# Altium PCB PCB_Lora(long-range)-board_2026-11-07.pcbdoc (part 1 of 2)
Units mil, origin at the board's own origin, x right, y up, seen from the top; angles counter-clockwise.
Board outline 3860 x 3395 mil, 2 copper layers (Top Layer, Bottom Layer); 64 components, 85 nets, 224 pads, 399 vias.
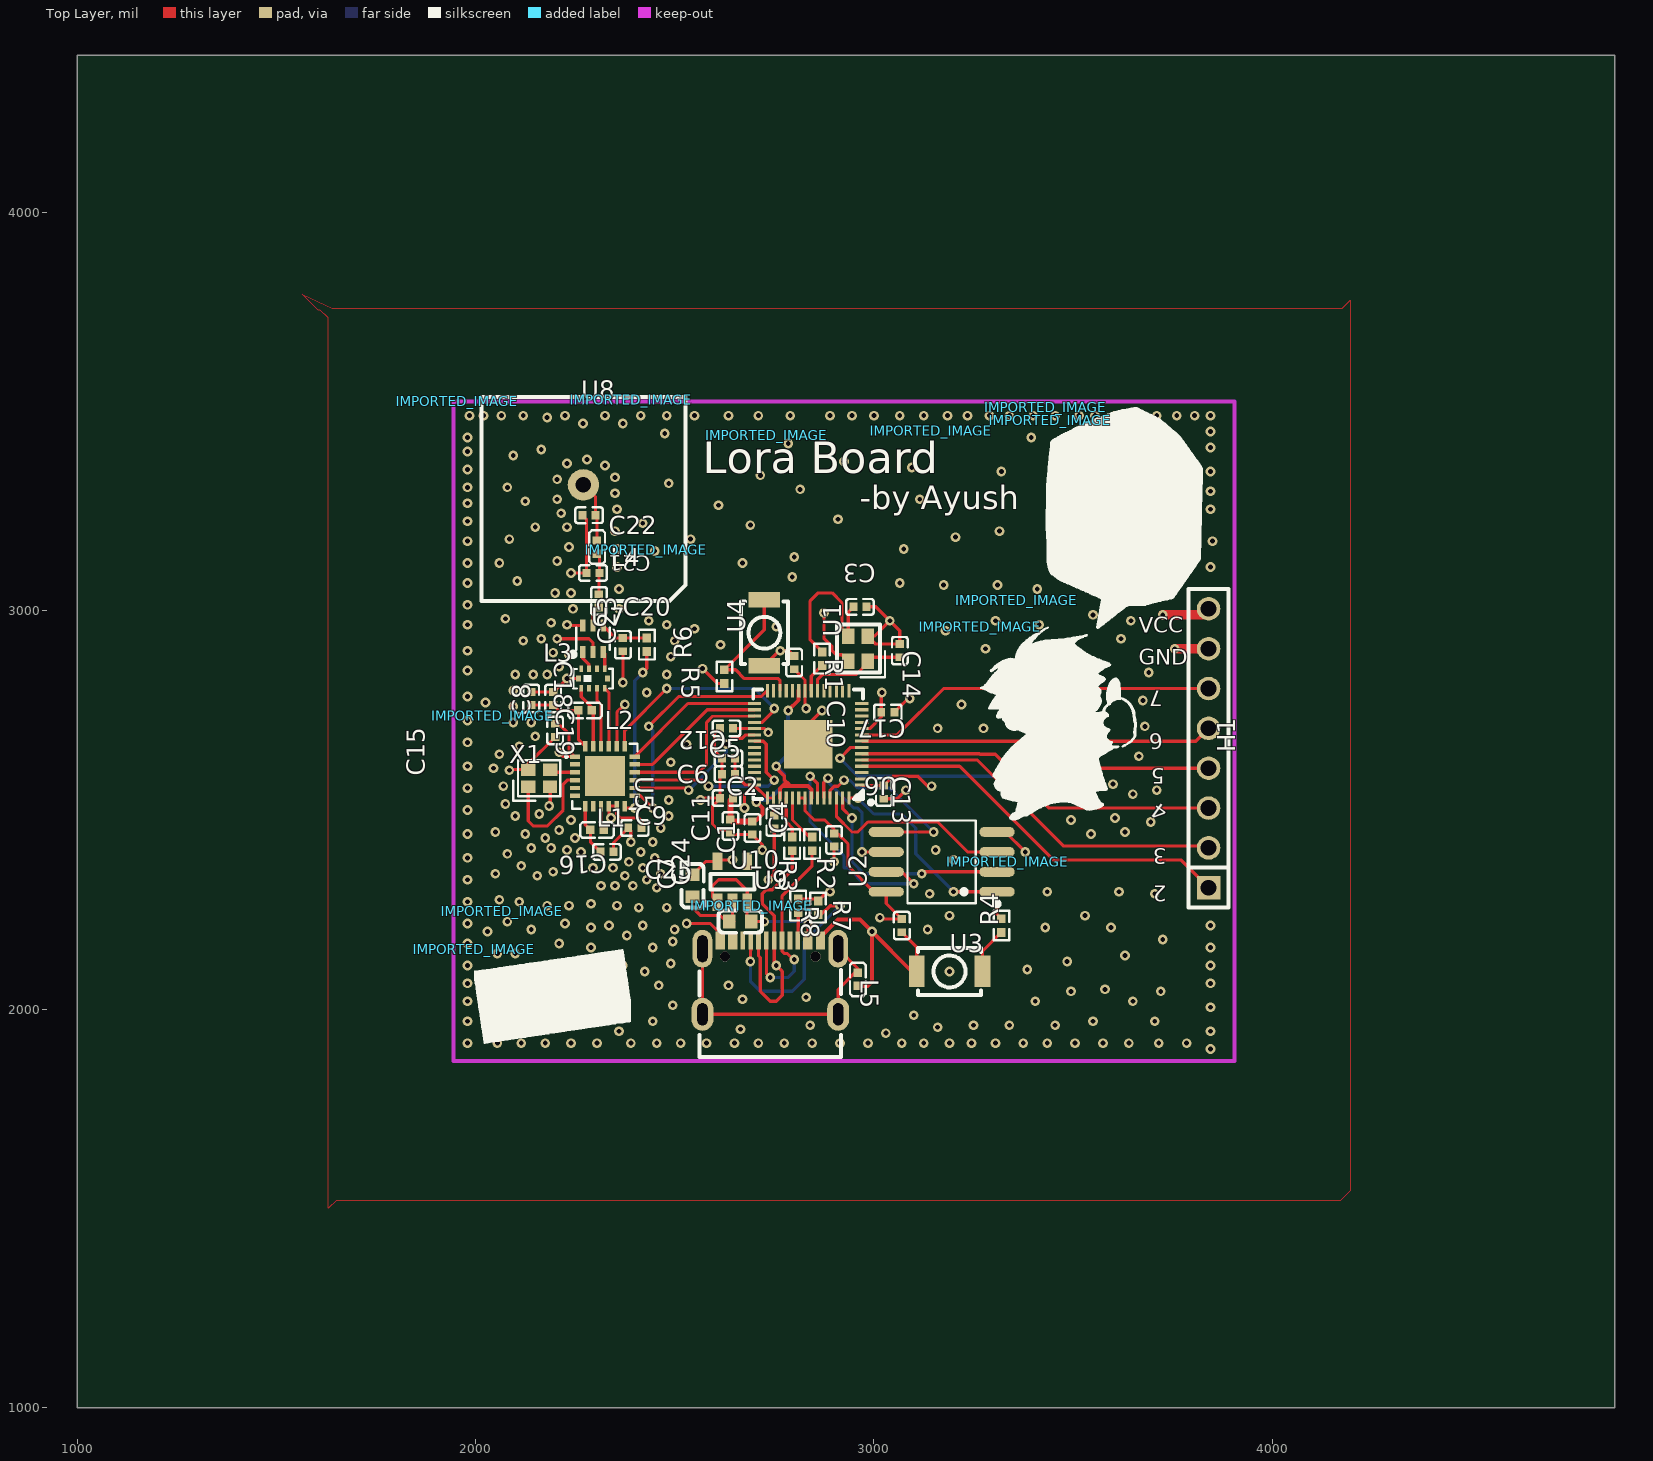
[diagram p0: Top Layer view]
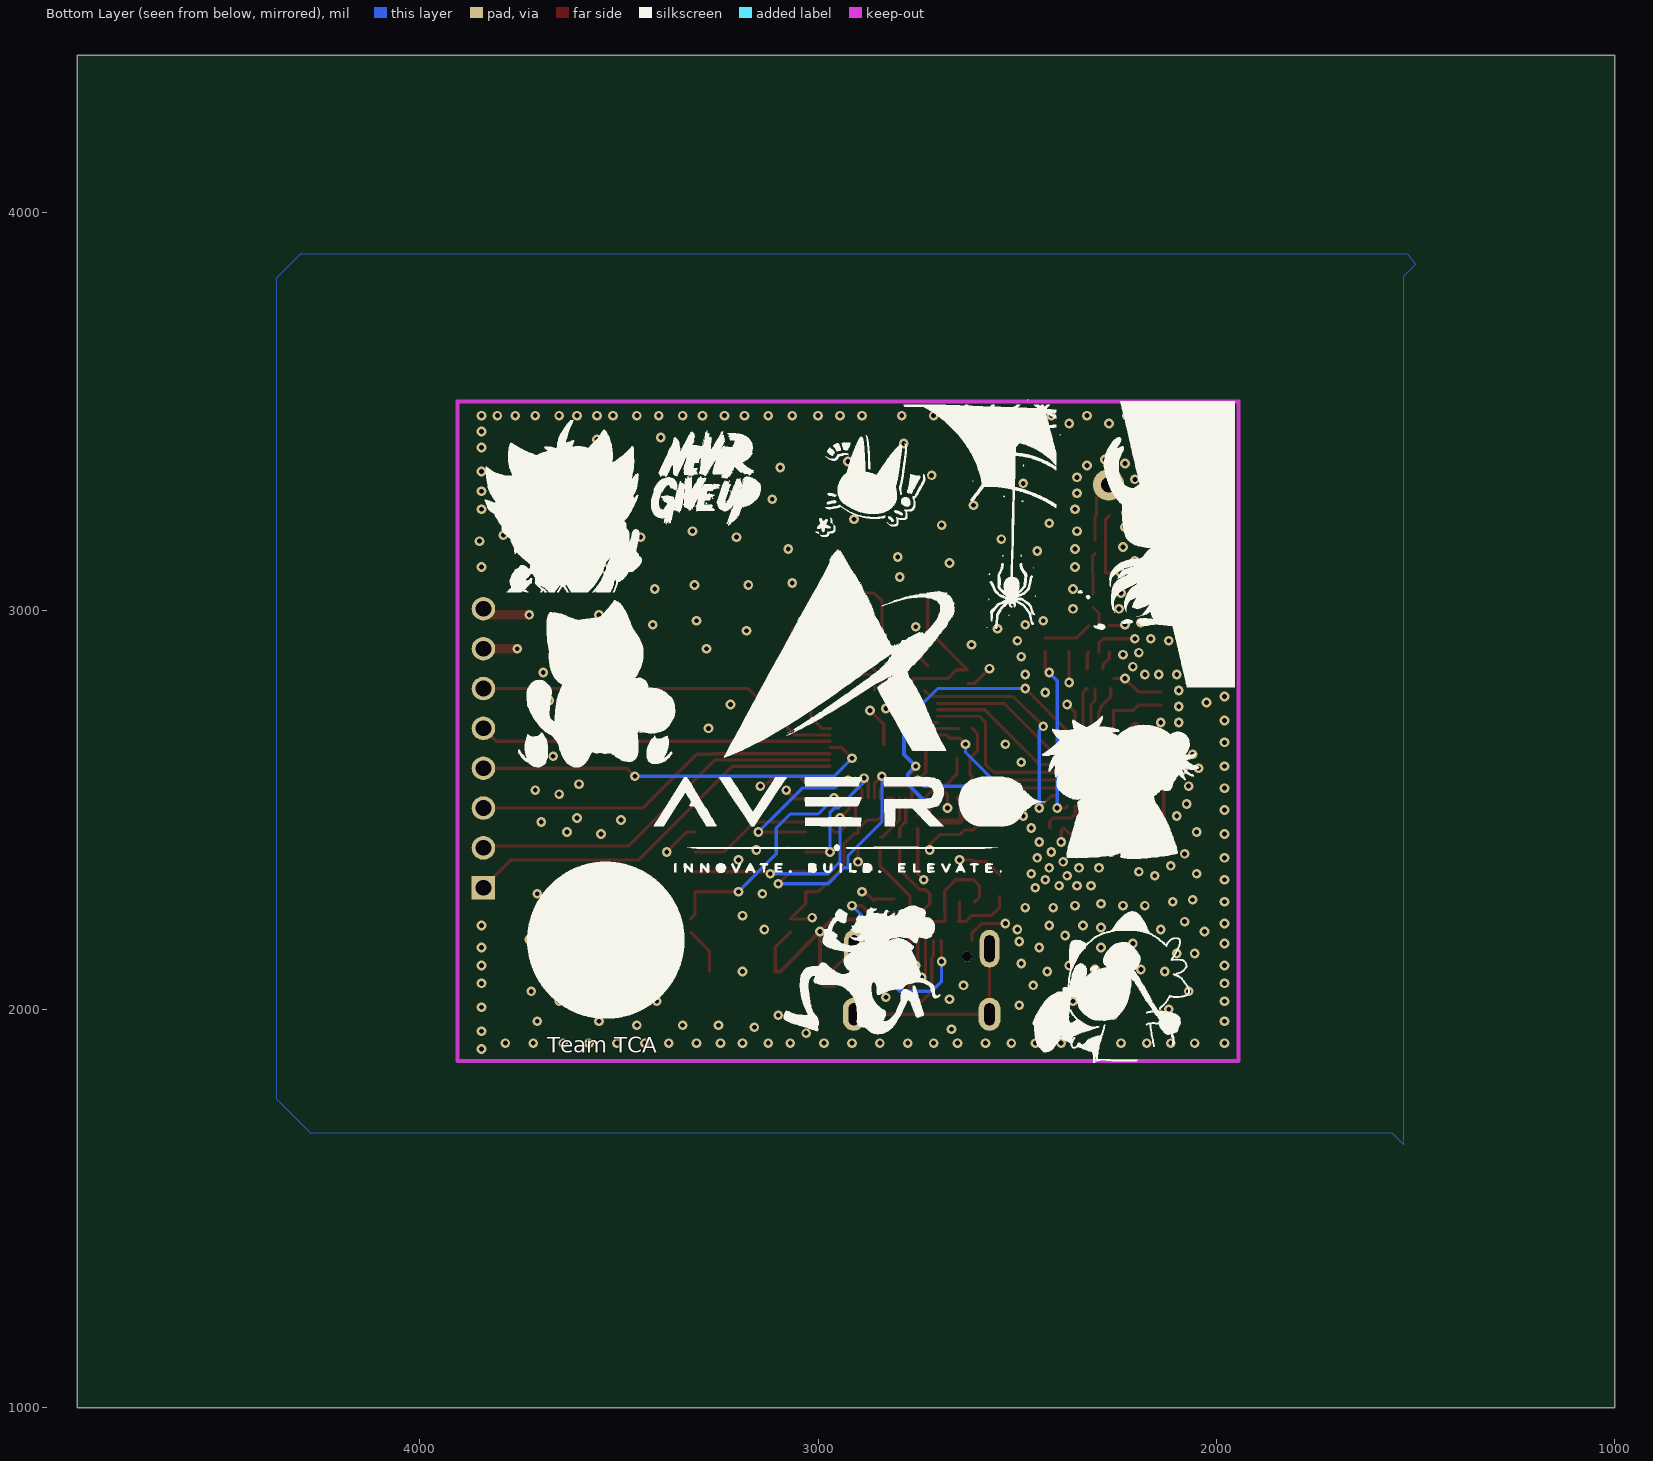
[diagram p1: Bottom Layer view, seen from below]

## Layer stack, top to bottom
Top Layer: signal copper (thickness not stored)
Dielectric: dielectric 12.6, FR-4, Dk 4.8
Bottom Layer: signal copper (thickness not stored)

## Board outline
4860,1000 1000,1000 1000,4395 4860,4395

## Components (designator, comment, footprint, x,y, rotation, side; value= is the part's Value field where it differs from the comment)
C1 "100nF" C0402 2640,2460 r90 top
C2 "100nF" C0402 2630,2530 r0 top
C3 "15pF" C0402 2965,3010 r180 top
C4 "100nF" C0402 2750,2470 r90 top
C5 "100nF" C0402 2635,2630 r0 top
C6 "100nF" C0402 2635,2590 r0 top
C7 "100nF" C0402 3070,2210 r90 top
C8 "100nF" C0402 2200,2700 r90 top
C9 "100nF" C0402 2400,2455 r0 top
C10 "100nF" C0402 2800,2870 r270 top
C11 "1uf" C0402 2695,2455 r90 top
C12 "1uF" C0402 2630,2705 r180 top
C13 "100nF" C0402 3025,2545 r270 top
C14 "15pF" C0402 3065,2900 r270 top
C15 "100nF" C0402 2900,2425 r90 top
C16 "470nf" C0402 2330,2395 r180 top
C17 "100nf" C0402 3035,2745 r180 top
C18 "47pF" C0402 2140,2780 r270 top
C19 "47pF" C0402 2195,2780 r270 top
C20 "39pF" C0402 2310,3025 r270 top
C21 "3.3pF" C0402 2295,3095 r180 top
C22 "3.3pF" C0402 2285,3240 r180 top
C23 "1nF" C0402 2370,2915 r90 top
C24 "10uF" C0603 2545,2310 r90 top
C25 "10uF" C0603 2665,2220 r0 top
H1 "Header-Male-2.54_1x8" HDR-TH_8P-P2.54-V-M 3840,2655 r90 top
IMPORTED_IMAGE "IMPORTED_IMAGE" IMPORTED_IMAGE 3442.58,3478.58 r0 top
IMPORTED_IMAGE "IMPORTED_IMAGE" IMPORTED_IMAGE 3143.78,3452.13 r0 top
IMPORTED_IMAGE "IMPORTED_IMAGE" IMPORTED_IMAGE 2428.12,3152.76 r0 top
IMPORTED_IMAGE "IMPORTED_IMAGE" IMPORTED_IMAGE 2731.18,3440.17 r0 top
IMPORTED_IMAGE "IMPORTED_IMAGE" IMPORTED_IMAGE 2391.1,3530.24 r0 top
IMPORTED_IMAGE "IMPORTED_IMAGE" IMPORTED_IMAGE 2043.85,2736.32 r0 top
IMPORTED_IMAGE "IMPORTED_IMAGE" IMPORTED_IMAGE 1954.47,3526.6 r0 top
IMPORTED_IMAGE "IMPORTED_IMAGE" IMPORTED_IMAGE 3358.59,3027.19 r0 top
IMPORTED_IMAGE "IMPORTED_IMAGE" IMPORTED_IMAGE 2067.35,2245.43 r0 top
IMPORTED_IMAGE "IMPORTED_IMAGE" IMPORTED_IMAGE 2693.22,2260.09 r0 top
IMPORTED_IMAGE "IMPORTED_IMAGE" IMPORTED_IMAGE 3336.01,2370.08 r0 top
IMPORTED_IMAGE "IMPORTED_IMAGE" IMPORTED_IMAGE 3266.7,2960.61 r0 top
IMPORTED_IMAGE "IMPORTED_IMAGE" IMPORTED_IMAGE 3431.95,3510.94 r0 top
IMPORTED_IMAGE "IMPORTED_IMAGE" IMPORTED_IMAGE 1996.42,2150.39 r0 top
L1 "15uH" L0402 2305,2450 r0 top
L2 "47nH" L0402 2275,2750 r0 top
L3 "0900FM15D0039001E" FILTER-SMD_10P-L2.0-W1.3-BL 2295,2830 r0 top
L4 "9.1nH" L0402 2305,3160 r90 top
L5 "1KΩ" L0402 2960,2075 r270 top
R1 "1k" R0402 2870,2880 r270 top
R2 "27.4" R0402 2845,2415 r270 top
R3 "27.4" R0402 2795,2415 r270 top
R4 "1k" R0402 3320,2210 r90 top
R5 "10k" R0402 2625,2835 r270 top
R6 "100" R0402 2430,2915 r90 top
R7 "5.1K" R0402 2860,2255 r270 top
R8 "5.1K" R0402 2810,2260 r270 top
U1 "XTAL12MHZ" CRYSTAL-SMD_4P-L2.5-W2.0-BL_XTAL12MHZ 2960,2905 r90 top
U2 "W25Q128JVSIQ" SOIC-8_L5.3-W5.3-P1.27-LS8.0-BL 3170,2370 r90 top
U3 "TS-1071AD-A5B3-D4" KEY-SMD_2P-L4.0-W3.0-P4.20 3190,2095 r0 top
U4 "TS-1071AD-A5B3-D4" KEY-SMD_2P-L4.0-W3.0-P4.20 2725,2945 r90 top
U5 "-" QFN-24_L4.0-W4.0-P0.50-BL-EP2.6 2325,2585 r270 top
U6 "RP2040" LQFN-56_L7.0-W7.0-P0.4-EP 2835,2665 r180 top
U7 "PE4259-63" SC-70-6_L2.2-W1.3-P0.65-LS2.1-BL 2295,2930 r0 top
U8 "GPS_PATCH_ANTENNA - APAE1575R1340ABDD6-T" "GPS_PATCH_ANTENNA - APAE1575R1340ABDD6-T" 2015,3025 r0 top
U9 "USB_C_RECEPTACLE_HRO_TYPE-C-31-M-12" USB-SMD_TYPE-C16PIN-1 2740,2080 r0 top
U10 "AP2112K-3.3TRG1" SOT-25-5_L2.9-W1.6-P0.95-LS2.8-BL 2645,2320 r0 top
X1 "32MHz" CRYSTAL-SMD_4P-L2.0-W1.6-BL 2160,2580 r0 top

## Footprints (in the part's own frame and the unit in brackets; to place one, negate y for a bottom-side part, rotate by r counter-clockwise, add the part's x,y. Pads: shape width x height; smd on the part's side, far side on the other; paste and mask are expansions set on the pad)
C0402 [mm]
  rect 0.5x0.54 smd paste+0 mask+0.051: 1(-0.42,0) 2(0.42,0)
  silkscreen extent -0.87,-0.5 0.87,0.5
C0603 [mm]
  rect 0.8x0.9 smd paste+0 mask+0.051: 1(-0.7,0) 2(0.7,0)
  silkscreen extent -1.39,-0.71 1.39,0.71
CRYSTAL-SMD_4P-L2.0-W1.6-BL [mm]
  rect 0.9x0.8 smd paste+0 mask+0.051: 1(-0.7,-0.55) 2(0.7,-0.55) 3(0.7,0.55) 4(-0.7,0.55)
  silkscreen extent -1.65,-1.45 1.35,1.15
CRYSTAL-SMD_4P-L2.5-W2.0-BL_XTAL12MHZ [mm]
  rect 1x0.8 smd paste+0 mask+0.051: 1(-0.8,-0.625) 2(0.8,-0.625) 3(0.8,0.625) 4(-0.8,0.625)
  silkscreen extent -1.82,-1.73 1.55,1.33
FILTER-SMD_10P-L2.0-W1.3-BL [mm]
  rect 0.25x0.4 smd paste+0 mask+0.051: 1(-0.75,-0.625) 2(-0.25,-0.625) 3(0.25,-0.625) 4(0.75,-0.625) 6(0.75,0.625) 7(0.25,0.625) 8(-0.25,0.625) 9(-0.75,0.625)
  rect 0.3x0.4 smd paste+0 mask+0.051: 5(0.925,0) 10(-0.925,0)
  silkscreen extent -1.25,-0.64 1.25,0.62
"GPS_PATCH_ANTENNA - APAE1575R1340ABDD6-T" [mm]
  round 2 hole 1 paste+0 mask+0.051: 1(6.5,7.4)
  silkscreen extent 0,0 13,13
HDR-TH_8P-P2.54-V-M [mm]
  rect 1.5x1.5 hole 1 paste+0 mask+0.051: 1(-8.89,0)
  round 1.5 hole 1 paste+0 mask+0.051: 2(-6.35,0) 3(-3.81,0) 4(-1.27,0) 5(1.27,0) 6(3.81,0) 7(6.35,0) 8(8.89,0)
  silkscreen extent -10.16,-1.27 10.16,1.27
IMPORTED_IMAGE [mil]
KEY-SMD_2P-L4.0-W3.0-P4.20 [mm]
  rect 1x2 smd paste+0 mask+0.05: 1(-2.1,0) 2(2.1,0)
  silkscreen extent -2,-1.5 2,1.5
L0402 [mm]
  rect 0.54x0.54 smd paste+0 mask+0.051: 1(-0.42,0) 2(0.42,0)
  silkscreen extent -1.07,-0.51 1.07,0.49
LQFN-56_L7.0-W7.0-P0.4-EP [mm]
  rect 0.85x0.2 smd paste+0 mask+0.05: 1(-3.425,2.6) 2(-3.425,2.2) 3(-3.425,1.8) 4(-3.425,1.4) 5(-3.425,1) 6(-3.425,0.6) 7(-3.425,0.2) 8(-3.425,-0.2) 9(-3.425,-0.6) 10(-3.425,-1) 11(-3.425,-1.4) 12(-3.425,-1.8) 13(-3.425,-2.2) 14(-3.425,-2.6) 29(3.425,-2.6) 30(3.425,-2.2) 31(3.425,-1.8) 32(3.425,-1.4) 33(3.425,-1) 34(3.425,-0.6) 35(3.425,-0.2) 36(3.425,0.2) 37(3.425,0.6) 38(3.425,1) 39(3.425,1.4) 40(3.425,1.8) 41(3.425,2.2) 42(3.425,2.6)
  rect 0.2x0.85 smd paste+0 mask+0.05: 15(-2.6,-3.425) 16(-2.2,-3.425) 17(-1.8,-3.425) 18(-1.4,-3.425) 19(-1,-3.425) 20(-0.6,-3.425) 21(-0.2,-3.425) 22(0.2,-3.425) 23(0.6,-3.425) 24(1,-3.425) 25(1.4,-3.425) 26(1.8,-3.425) 27(2.2,-3.425) 28(2.6,-3.425) 43(2.6,3.425) 44(2.2,3.425) 45(1.8,3.425) 46(1.4,3.425) 47(1,3.425) 48(0.6,3.425) 49(0.2,3.425) 50(-0.2,3.425) 51(-0.6,3.425) 52(-1,3.425) 53(-1.4,3.425) 54(-1.8,3.425) 55(-2.2,3.425) 56(-2.6,3.425)
  rect 3.1x3.1 smd paste+0 mask+0.05: 57(0,0)
  silkscreen extent -4.13,-3.5 3.5,3.83
QFN-24_L4.0-W4.0-P0.50-BL-EP2.6 [mm]
  rect 0.28x0.665 smd paste-100 mask+0.05: 1(-1.25,-1.907) 2(-0.75,-1.907) 3(-0.25,-1.907) 4(0.25,-1.907) 5(0.75,-1.907) 6(1.25,-1.907) 13(1.25,1.907) 14(0.75,1.907) 15(0.25,1.907) 16(-0.25,1.907) 17(-0.75,1.907) 18(-1.25,1.907)
  rect 0.665x0.28 smd paste-100 mask+0.05: 7(1.907,-1.25) 8(1.907,-0.75) 9(1.907,-0.25) 10(1.907,0.25) 11(1.907,0.75) 12(1.907,1.25) 19(-1.907,1.25) 20(-1.907,0.75) 21(-1.907,0.25) 22(-1.907,-0.25) 23(-1.907,-0.75) 24(-1.907,-1.25)
  rect 2.55x2.55 smd paste-100 mask+0.05: 25(0,0)
  silkscreen extent -2.08,-2.53 2.08,2.08
R0402 [mm]
  rect 0.566x0.54 smd paste-100 mask+0.051: 1(-0.433,0) 2(0.433,0)
  silkscreen extent -0.94,-0.5 0.94,0.5
SC-70-6_L2.2-W1.3-P0.65-LS2.1-BL [mm]
  rect 0.35x0.78 smd paste+0 mask+0.051: 1(-0.65,-0.84) 2(0,-0.84) 3(0.65,-0.84) 4(0.65,0.84) 5(0,0.84) 6(-0.65,0.84)
  silkscreen extent -1.43,-1.14 1.08,0.7
SOIC-8_L5.3-W5.3-P1.27-LS8.0-BL [mm]
  oval 0.63x2.25 smd paste+0 mask+0.051: 1(-1.905,-3.53) 2(-0.635,-3.53) 3(0.635,-3.53) 4(1.905,-3.53) 5(1.905,3.53) 6(0.635,3.53) 7(-0.635,3.53) 8(-1.905,3.53)
  silkscreen extent -2.82,-3.68 2.64,2.18
SOT-25-5_L2.9-W1.6-P0.95-LS2.8-BL [mil]
  rect 24.5x43.5 smd paste+0 mask+2: 1(-37.39,-51.18) 2(-0.03,-51.18) 3(37.39,-51.18) 4(37.39,51.18) 5(-37.39,51.18)
  silkscreen extent -75,-60 56,20
USB-SMD_TYPE-C16PIN-1 [mm]
  oval 1.25x2.4 hole 0.65 slot 1.7 at 90 deg paste+0 mask+0.05: 17(-4.325,1.828) 18(4.325,1.828)
  oval 1.4x2.1 hole 0.65 slot 1.4 at 90 deg paste+0 mask+0.05: 19(-4.325,-2.353) 20(4.325,-2.353)
  rect 0.6x1.15 smd paste-100 mask+0.051: A1B12(-3.2,2.353) A4B9(-2.4,2.353) B1A12(3.2,2.353) B4A9(2.4,2.353)
  rect 0.3x1.15 smd paste-100 mask+0.051: A5(-1.25,2.353) A6(-0.25,2.353) A7(0.25,2.353) A8(1.25,2.353) B5(1.75,2.353) B6(0.75,2.353) B7(-0.75,2.353) B8(-1.75,2.353)
  round 0.65 hole 0.65 unplated paste+0: ""(-2.89,1.328) ""(2.89,1.328)
  silkscreen extent -4.5,-5.07 4.5,0.47

## Via types
v1: diameter 24.41, hole 12.2, Top Layer to Bottom Layer, tented both sides, 399 vias

## Nets (pads, with @x,y where several pads share a name; then routed paths per layer and width w, separated by ;. In a path a pad name is that pad's centre, name@x,y a point inside that pad or via, vN(x,y) a via of type N, cw(c..) or ccw(c..) an arc to the next point about the centre after c; other vN are vias at no path point)
1V1: C1.2 C2.2 C11.2 U6.23 U6.45 U6.50 | length 736.6
  Top Layer w10: C11.2@2695,2471.53 2701.54,2471.54 2720,2490 2720,2505 v1(2705,2520) ; v1(2755,2610) 2755,2605 2775,2585 2775,2576.01 2786.01,2565 ; U6.45@2764.14,2530.16 2764.14,2554.14 2775,2565 ; 2767.1,2557.1 2770,2560 2835,2560 2842.9,2552.1 U6.50@2842.88,2530.16 ; v1(2785,2750) 2811.38,2776.38 U6.23@2811.38,2799.84
  Top Layer w15.75: C2.2@2646.53,2530 2640,2523.46 C1.2@2640,2476.53 2645,2471.54 C11.2@2695,2471.53
  Bottom Layer w10: v1(2705,2520) 2710,2525 2735,2525 2775,2565 2775,2590 v1(2755,2610) 2785,2640 v1(2785,2750)
C20_1: C20.1 C21.1 L4.1 | length 105.3
  Top Layer w8.07: L4.1@2305,3143.47 2311.54,3136.92 C21.1@2311.53,3095 2310,3093.46 C20.1@2310,3041.53
GND: C1.1 C2.1 C3.1 C4.1 C5.1 C6.1 C7.1 C8.1 C9.1 C10.1 C11.1 C12.2 C13.2 C14.1 C15.1 C16.1 C17.1 C18.1 C19.1 C21.2 C22.2 C23.1 H1.7 L3.10 L5.2 R7.1 R8.1 U1.2 U1.4 U2.4 U3.1 U4.1 U5.20 U6.57 U7.2 U9.A1B12 U9.B1A12 X1.2 X1.4 | length 3350.9
  Top Layer w8.07: v1(2085,2600) 2086.65,2601.65 2132.44,2601.65 2132.44,2615.9 C8.1@2200,2683.47 ; C18.1@2140,2796.53 C19.1@2195,2796.53 2196.54,2796.54 v1(2230,2830) L3.10@2258.59,2830 ; v1(2185,2510) 2187.56,2512.56 X1.2@2187.56,2558.35 ; v1(2205,2930) 2285,2930 2295,2920 U7.2@2295,2896.93 ; v1(2240,3095) C21.2@2278.47,3095 2278.46,3230 C22.2@2268.47,3240 ; C16.1@2346.53,2395 2346.54,2418.08 C9.1@2383.47,2455 2390,2448.46 v1(2390,2420) ; U5.20@2354.53,2660.1 2355,2660.57 2355,2745 v1(2375,2765) ; v1(2370,2820) C23.1@2370,2898.47 ; v1(2530,2215) 2590,2215 2614.02,2190.98 U9.A1B12@2614.02,2172.62 ; v1(2565,2525) 2570,2530 C2.1@2613.47,2530 ; C2.1@2610,2526.54 C2.1@2613.47,2530 ; C12.2@2613.47,2705 2600,2691.54 2600,2648.47 C5.1@2618.47,2630 C6.1@2618.47,2590 2613.46,2584.99 C2.1@2613.47,2530 ; v1(2720,2400) 2720,2413.46 C11.1@2695,2438.47 2645,2438.46 C1.1@2640,2443.47 2633.46,2450 2610,2450 2595,2465 2595,2510 2613.46,2528.46 C2.1@2613.47,2530 ; U4.1@2725,2862.32 2762.68,2900 v1(2765,2900) 2786.54,2900 C10.1@2800,2886.53 ; v1(2735,2325) 2750,2340 C4.1@2750,2453.47 ; R8.1@2810,2277.04 2855,2277.04 R7.1@2860,2272.04 2882.96,2295 v1(2890,2295) ; U6.57@2835,2665 2835,2715 v1(2870,2750) ; v1(2875,2995) 2875,2930 2895,2910 2895,2900 2905,2890 2918.9,2890 U1.4@2935.39,2873.5 ; v1(2900,2370) C15.1@2900,2408.47 ; C3.1@2981.53,3010 3005,3010 v1(3040,2975) ; C13.2@3025,2528.47 3058.46,2528.46 v1(3080,2550) ; C17.1@3051.53,2745 3061.53,2755 3086.53,2780 v1(3090,2780) ; C7.1@3070,2193.47 3107.32,2156.14 U3.1@3107.32,2095 ; U2.4@3308.98,2445 3330,2445 v1(3380,2395) ; v1(3040,2975) 3065,2950 C14.1@3065,2916.53 3004.57,2916.54 U1.2@2984.61,2936.5 3001.5,2936.5 v1(3040,2975)
  Top Layer w10: U9.B1A12@2865.99,2172.62 2865.98,2180.98 2910,2225 2965,2225 v1(2995,2195) ; L5.2@2960,2058.47 2983.46,2058.46 2995,2070 v1(2995,2195) ; U3.1@3107.32,2095 3095,2095 v1(2995,2195)
  Top Layer w23.62: v1(3755,2905) H1.7@3840,2905
  other v1: 3845,1900 1980,1915 2055,1915 2115,1915 2175,1915 2240,1915 2305,1915 2390,1915 2455,1915 2515,1915 2580,1915 2650,1915 2710,1915 2775,1915 2845,1915 2915,1915 2985,1915 3070,1915 3125,1915 3190,1915 3245,1915 3305,1915 3375,1915 3435,1915 3505,1915 3575,1915 3640,1915 3715,1915 3785,1915 3030,1940 2360,1945 3845,1945 2665,1950 3160,1955 2840,1960 3250,1960 3340,1960 3455,1960 1980,1970 2445,1970 3550,1970 3705,1970 2260,1985 3100,1985 2120,2000 3845,2005 2495,2010 1980,2020 2360,2020 3405,2020 3650,2020 2670,2025 2830,2030 2070,2045 2255,2045 3495,2045 3720,2045 3580,2050 2335,2055 2460,2060 2635,2060 1980,2065 3845,2065 2130,2095 2425,2095 3190,2095 2190,2100 2305,2100 3385,2100 2260,2105 1980,2110 2370,2110 3845,2110 2490,2115 3485,2120 3630,2135 2055,2140 2100,2140 2290,2155 2445,2155 3845,2155 1980,2165 2210,2165 2495,2170 3725,2175 2380,2185 2030,2195 2140,2200 2500,2200 3135,2200 2290,2205 3430,2205 3595,2205 2335,2210 2420,2210 3845,2210 1980,2215 2225,2215 2080,2220 3190,2235 3530,2235 2410,2255 2480,2255 2180,2260 2235,2260 2355,2260 2290,2265 1980,2270 2110,2270 2060,2275 3140,2290 3705,2290 3435,2295 3615,2295 2455,2305 2315,2310 2350,2310 2395,2310 1980,2325 2430,2325 2155,2335 2375,2335 2050,2340 2465,2340 2195,2345 2295,2355 2345,2355 2420,2355 2115,2360 2385,2370 3200,2375 1980,2380 2450,2380 2080,2390 2265,2395 2415,2395 2230,2400 3155,2400 2140,2405 2190,2405 2445,2420 2175,2430 2250,2430 1980,2440 2125,2440 3545,2440 2050,2445 3630,2445 2210,2450 2465,2455 3695,2470 2240,2475 3495,2475 3605,2480 2100,2485 2485,2485 2160,2490 1980,2500 2075,2515 2485,2525 3650,2540 3710,2550 1980,2555 2070,2560 3600,2565 2045,2605 1980,2610 2490,2620 3665,2635 2060,2640 2110,2660 2530,2665 1980,2670 2150,2685 3160,2705 3275,2705 3445,2705 3680,2710 2095,2720 2140,2720 1980,2725 2095,2760 3220,2765 2025,2770 3675,2775 1980,2785 2430,2795 2095,2800 2100,2840 2145,2840 2180,2840 2480,2840 3690,2845 1980,2850 2210,2860 3560,2865 3455,2875 2490,2885 2235,2890 2195,2895 1980,2900 3280,2905 2615,2915 2120,2925 2500,2925 2165,2930 3620,2930 3180,2950 2550,2955 2755,2960 1980,2965 2480,2965 3415,2965 2190,2970 2435,2975 3305,2975 3645,2975 2075,2980 3550,2990 2245,3005 2360,3005 1980,3015 2200,3045 2240,3045 2360,3055 3410,3055 3175,3065 3310,3065 1980,3070 3065,3070 2105,3075 3695,3080 2795,3085 3535,3105 2355,3110 3845,3110 1980,3120 2060,3120 2670,3120 2205,3125 2800,3135 2450,3150 2355,3155 3075,3155 2235,3160 1980,3175 3850,3175 2085,3180 2540,3180 3205,3185 3445,3185 3790,3190 2350,3200 3315,3200 2150,3210 2230,3210 2690,3215 2420,3220 1980,3225 2910,3230 2215,3245 3620,3250 2355,3255 3845,3255 2610,3265 1980,3270 2125,3275 2205,3280 3115,3280 2350,3295 3845,3300 2815,3305 1980,3310 2080,3310 3510,3315 2485,3320 2205,3330 2350,3335 2715,3340 3320,3350 3845,3350 1980,3355 3690,3355 3095,3360 2325,3365 2230,3370 2925,3375 2280,3380 2095,3390 1980,3400 2165,3405 3845,3410 2785,3420 3555,3430 1980,3435 3395,3435 2475,3445 3845,3450 2270,3470 2370,3470 2180,3485 1985,3490 2020,3490 2065,3490 2120,3490 2225,3490 2325,3490 2415,3490 2480,3490 2550,3490 2635,3490 2710,3490 2790,3490 2890,3490 2945,3490 3000,3490 3065,3490 3125,3490 3185,3490 3235,3490 3290,3490 3340,3490 3400,3490 3455,3490 3515,3490 3555,3490 3605,3490 3650,3490 3710,3490 3760,3490 3805,3490 3845,3490
GPIO2: H1.1 U6.4 | length 996.4
  Top Layer w8.07: U6.4@2969.84,2609.89 3215.11,2609.89 3450,2375 3770,2375 H1.1@3840,2305
GPIO3: H1.2 U6.5 | length 961.5
  Top Layer w8.07: U6.5@2969.84,2625.63 3259.37,2625.63 3475,2410 3835,2410 H1.2@3840,2405
GPIO4: H1.3 U6.6 | length 926.7
  Top Layer w8.07: U6.6@2969.84,2641.38 3265,2641.38 3266.38,2640 3305,2640 3440,2505 H1.3@3840,2505
GPIO5: H1.4 U6.7 | length 1018
  Top Layer w8.07: v1(2915,2630) 2942.13,2657.13 U6.7@2969.84,2657.13 ; v1(3460,2585) 3480,2605 H1.4@3840,2605
  Bottom Layer w8.07: v1(2915,2630) 2960,2585 v1(3460,2585)
GPIO6: H1.5 U6.8 | length 898.5
  Top Layer w8.07: U6.8@2969.84,2672.88 3807.88,2672.88 H1.5@3840,2705 H1.5@3840,2720
GPIO7: H1.6 U6.9 | length 918.4
  Top Layer w8.07: U6.9@2969.84,2688.62 3058.63,2688.63 3175,2805 H1.6@3840,2805
L3_2: L3.2
L3_5: L3.5
L3_6: L3.6 U7.3 | length 44
  Top Layer w8.07: U7.3@2320.59,2896.93 2324.53,2892.99 L3.6@2324.53,2854.61
L3_7: L3.7
L3_8: L3.8 U7.1 | length 48.8
  Top Layer w8.07: U7.1@2269.41,2896.93 2269.41,2880.59 2285.16,2864.84 L3.8@2285.16,2854.61
L3_9: L3.9
L4_2: C22.1 L4.2 U8.1 | length 153.9
  Top Layer w8.07: U8.1@2270.91,3316.34 2301.54,3285.71 C22.1@2301.53,3240 2305,3236.54 L4.2@2305,3176.53
QPI_SS: R4.2 U2.1 U6.56 | length 623.6
  Top Layer w8.07: U6.56@2937.36,2530.16 2959.84,2530.16 v1(2960,2530) ; v1(3200,2295) U2.1@3308.98,2295 ; U2.1@3265,2295 U2.1@3308.98,2295 ; R4.2@3320,2227.04 3308.98,2238.06 U2.1@3308.98,2295
  Bottom Layer w8.07: v1(2960,2530) 3000,2490 3070,2490 3105,2455 3105,2390 v1(3200,2295)
QSPI_SCLK: U2.6 U6.52 | length 341.3
  Top Layer w8.07: U6.52@2874.37,2530.16 2874.37,2569.37 v1(2885,2580) ; v1(2970,2395) U2.6@3031.02,2395
  Bottom Layer w8.07: v1(2885,2580) 2885,2570 2950,2505 2960,2505 2970,2495 v1(2970,2395)
QSPI_SD0: U2.5 U6.53 | length 463
  Top Layer w8.07: U6.53@2890.12,2530.16 2890.12,2550.12 2900,2560 2910,2560 v1(2925,2575) ; U2.5@3031.02,2445 v1(3150,2445)
  Bottom Layer w8.07: v1(2925,2575) 2940,2575 2960,2555 3040,2555 3095,2500 v1(3150,2445)
QSPI_SD1: U2.2 U6.55 | length 548.3
  Top Layer w8.07: U6.55@2921.62,2530.16 2921.62,2503.38 v1(2945,2480) ; v1(3120,2340) 3125,2345 U2.2@3308.98,2345
  Bottom Layer w8.07: v1(2945,2480) 2945,2370 2975,2340 v1(3120,2340)
QSPI_SD2: U2.3 U6.54 | length 506.8
  Top Layer w8.07: U6.54@2905.87,2530.16 2905.9,2500.9 2905.9,2484.1 2945,2445 2960,2445 2985,2470 3160,2470 3235,2395 U2.3@3308.98,2395
QSPI_SD3: U2.7 U6.51 | length 600.7
  Top Layer w8.07: v1(2840,2585) 2858.62,2566.38 U6.51@2858.62,2530.16 ; U2.7@3031.02,2345 3070,2345 v1(3100,2315)
  Bottom Layer w8.07: v1(2840,2585) 2840,2470 2920,2390 2925,2385 2925,2355 2935,2355 2940,2350 2975,2315 v1(3100,2315)
RUN: R5.1 U4.2 U6.26 | length 393
  Top Layer w8.07: R5.1@2625,2852.04 2653,2852 2675,2830 2760,2830 2764.14,2825.86 U6.26@2764.14,2799.84 ; R5.1@2625,2852.04 2725,2952.05 U4.2@2725,3027.68
S$9588: 
SHIELD: L5.1 U9.17 U9.18 U9.19 U9.20 | length 715.6
  Top Layer w8.07: U9.17@2569.72,2151.95 U9.19@2569.72,1987.38 U9.20@2910.28,1987.38 ; U9.20@2910.28,1987.38 2910.3,2049.7 2951.5,2091.5 L5.1@2960,2091.53 ; U9.18@2910.28,2151.95 2960,2102.23 L5.1@2960,2091.53
SPI_CLK: U5.18 U6.29 | length 355.2
  Top Layer w8.07: U5.18@2400.1,2634.21 2533.26,2767.37 U6.29@2700.17,2767.36
SPI_MISO: U5.16 U6.31 | length 419.7
  Top Layer w8.07: U5.16@2400.1,2594.84 2559.8,2594.8 2580,2615 2580,2720 2595,2735 U6.31@2700.17,2735.87
SPI_MOSI: U5.17 U6.30 | length 356.8
  Top Layer w8.07: U5.17@2400.1,2614.53 2444.53,2614.53 2581.62,2751.62 U6.30@2700.17,2751.62
SX_BUSY: U5.14 U6.34 | length 371.5
  Top Layer w8.07: U5.14@2400.1,2555.47 2529.53,2555.47 v1(2535,2550) ; v1(2630,2665) 2645,2680 2670,2680 2678.63,2688.63 U6.34@2700.17,2688.62
  Bottom Layer w8.07: v1(2535,2550) 2630,2645 v1(2630,2665)
SX_DI01: U5.13 U6.28 | length 601.7
  Top Layer w8.07: U5.13@2400.1,2535.79 2414.21,2535.79 v1(2445,2505) ; v1(2435,2710) 2510,2785 2717.79,2785 U6.28@2732.64,2799.84
  Bottom Layer w8.07: v1(2435,2710) 2445,2700 v1(2445,2505)
SX_DI02: R6.1 U5.12 | length 433.2
  Top Layer w8.07: U5.12@2374.21,2509.9 2379.11,2505 v1(2400,2505) ; v1(2420,2845) 2430,2855 R6.1@2430,2897.96
  Bottom Layer w8.07: v1(2400,2505) 2400,2825 v1(2420,2845)
SX_DI03: U5.6
SX_NRESET: U5.15 U6.35 | length 498.8
  Top Layer w8.07: U5.15@2400.1,2575.16 2569.84,2575.16 v1(2585,2560) ; U6.35@2700.17,2672.88 2722.12,2672.88 2730,2665 2730,2635 2730,2595 v1(2750,2575) v1@2745,2575
  Bottom Layer w8.07: v1(2585,2560) 2735,2560 v1(2750,2575)
SX_NSS: U5.19 U6.32 | length 546.6
  Top Layer w8.07: U5.19@2374.21,2660.1 2374.21,2699.21 v1(2480,2805) ; U6.32@2700.17,2720.12 2720.1,2720.1 2750,2750 v1(2750,2755)
  Bottom Layer w8.07: v1(2480,2805) 2700,2805 v1(2750,2755)
SX_RFI_N: L3.3 U5.22 | length 149.6
  Top Layer w8.07: L3.3@2304.84,2805.39 2304.84,2775.16 2315.16,2764.84 U5.22@2315.16,2660.1
SX_RFI_P: L3.4 U5.21 | length 149.6
  Top Layer w8.07: L3.4@2324.53,2805.39 2334.84,2795.08 U5.21@2334.84,2660.1
SX_RFO: L2.2 L3.1 U5.23 | length 157.7
  Top Layer w8.07: L3.1@2265.47,2805.39 2265.47,2784.53 2291.54,2758.46 L2.2@2291.53,2750 2295.47,2746.07 U5.23@2295.47,2660.1
SX_VR_PA: C18.2 C19.2 L2.1 U5.24 | length 221.1
  Top Layer w8.07: C18.2@2140,2763.47 C19.2@2195,2763.47 2208.46,2750 L2.1@2258.47,2750 2258.46,2677.43 U5.24@2275.79,2660.1
SX_XTA: U5.3 X1.3 | length 65.2
  Top Layer w8.07: X1.3@2187.56,2601.65 2194.37,2594.84 U5.3@2249.9,2594.84
SX_XTB: U5.4 X1.1 | length 294.2
  Top Layer w8.07: X1.1@2132.44,2558.34 2132.4,2472.6 2145,2460 2180,2460 2220,2500 2220,2565 2230.16,2575.16 U5.4@2249.9,2575.16
U1_3: C3.2 R1.1 U1.3 | length 407.8
  Top Layer w8.07: R1.1@2870,2897.04 2840,2927.04 2840,3025 2860,3045 2890,3045 2895,3045 2920,3020 2920,2951.89 U1.3@2935.39,2936.5 2935.39,2996.93 C3.2@2948.47,3010
U3_2: R4.1 U3.2 | length 117.6
  Top Layer w8.07: U3.2@3272.68,2095 3272.68,2145.64 R4.1@3320,2192.96
U5_2: U5.2
U5_5: U5.5
U5_7: C16.2 L1.1 U5.7 | length 130.5
  Top Layer w8.07: U5.7@2275.79,2509.9 2275.79,2462.67 L1.1@2288.47,2450 2288.46,2420 C16.2@2313.47,2395
U5_8: U5.8
U5_9: L1.2 U5.9 | length 62.5
  Top Layer w8.07: U5.9@2315.16,2509.9 2315.16,2456.38 L1.2@2321.53,2450
U5_25: U5.25
U6_2: U6.2
U6_3: U6.3
U6_11: U6.11
U6_12: U6.12
U6_13: U6.13
U6_14: U6.14
U6_15: U6.15
U6_16: U6.16
U6_17: U6.17
U6_18: U6.18
U6_19: U6.19
U6_24: U6.24
U6_25: U6.25
U6_27: U6.27
U6_36: U6.36
U6_37: U6.37
U6_38: U6.38
U6_39: U6.39
U6_40: U6.40
U6_41: U6.41
U6_46: R3.1 U6.46 | length 104.4
  Top Layer w8.07: U6.46@2779.88,2530.16 2779.88,2470.12 2795,2455 R3.1@2795,2432.04
U6_47: R2.1 U6.47 | length 122.3
  Top Layer w8.07: U6.47@2795.63,2530.16 2795.63,2475 2838.59,2432.04 R2.1@2845,2432.04
U7_4: C23.2 R6.2 U7.4 | length 122.7
  Top Layer w8.07: U7.4@2320.59,2963.07 2352.12,2931.54 C23.2@2370,2931.53 2370.5,2932.04 2375.52,2932.04 R6.2@2430,2932.04
U7_5: C20.2 U7.5 | length 51.6
  Top Layer w8.07: U7.5@2295,2963.07 2295,2993.46 C20.2@2310,3008.47
U9_A4B9: U9.A4B9
U9_A5: R7.2 U9.A5 | length 546.8
  Top Layer w8.07: v1(2690,2120) U9.A5@2690.79,2172.62 ; R7.2@2860,2237.96 2868,2238 2890,2260 v1(2915,2260)
  Bottom Layer w8.07: v1(2690,2120) 2690,2070 2715,2045 2795,2045 2825,2075 2825,2170 v1(2915,2260)
U9_A8: U9.A8
U9_B5: R8.2 U9.B5 | length 70.8
  Top Layer w8.07: U9.B5@2808.9,2172.62 2810,2173.72 R8.2@2810,2242.96
U9_B8: U9.B8
U10_2: C24.1 C25.1 U10.2 | length 199.4
  Top Layer w8.07: C24.1@2545,2282.45 2545,2255 2560,2240 ; 2557.36,2242.64 2565,2235 2615,2235 2630,2220 2648.46,2220 2644.97,2223.49 U10.2@2644.97,2268.82
U10_4: U10.4
USB_DM: R3.2 U9.A7 U9.B7 | length 624.6
  Top Layer w8.07: U9.B7@2710.47,2172.62 2710.47,2134.53 2715,2130 2715,2045 2740,2020 2755,2020 2770,2035 2770,2095 v1(2755,2110) 2749.84,2115.16 U9.A7@2749.84,2172.62 2749.84,2235.16 2720,2265 2720,2290 2730,2300 2745,2300 2795,2350 R3.2@2795,2397.96
USB_DP: R2.2 U9.A6 U9.B6 | length 516.3
  Top Layer w8.07: U9.A6@2730.16,2172.62 2730.16,2089.84 v1(2740,2080) ; U9.B6@2769.53,2172.62 U9.B6@2770,2173.1 ; v1(2800,2125) 2797.36,2125 2782.36,2140 2775,2140 2769.53,2145.47 U9.B6@2769.53,2172.62 2769.53,2284.53 2845,2360 R2.2@2845,2397.96
  Bottom Layer w8.07: v1(2740,2080) 2785,2080 2800,2095 v1(2800,2125)
VBUS: C25.2 U9.B4A9 U10.1 U10.3 | length 427.1
  Top Layer w8.07: U10.1@2607.61,2268.82 2595,2281.43 2595,2310 2610,2325 2655,2325 2682.39,2297.61 U10.3@2682.39,2268.82 C25.2@2681.5,2220 ; C25.2@2681.54,2220 v1(2725,2220) ; U9.B4A9@2834.49,2172.62 2835,2173.13 v1(2835,2215)
  Bottom Layer w8.07: v1(2725,2220) 2830,2220 v1(2835,2215)
VCC: C4.2 C5.2 C6.2 C7.2 C8.2 C9.2 C10.2 C12.1 C13.1 C15.2 C17.2 C24.2 H1.8 R5.2 U2.8 U5.1 U5.10 U5.11 U6.1 U6.10 U6.22 U6.33 U6.42 U6.43 U6.44 U6.48 U6.49 U7.6 U10.5 | length 1974.1
  Top Layer w8.07: C8.2@2200,2716.53 2208.46,2716.54 2235,2690 2235,2649.11 U5.1@2249.9,2634.21 2220.79,2634.21 v1(2210,2645) ; v1(2230,2965) 2231.93,2963.07 U7.6@2269.41,2963.07 ; v1(2340,2480) 2334.84,2485.16 U5.10@2334.84,2509.9 U5.11@2354.53,2509.9 ; U5.11@2354.53,2509.9 2354.5,2490.5 2365,2480 2410,2480 2418.7,2471.3 2418.7,2457.16 C9.2@2416.53,2455 ; C24.2@2545,2337.55 2578.62,2371.18 U10.5@2607.61,2371.18 2611.43,2375 v1(2645,2375) ; v1(2570,2855) 2607.05,2817.95 R5.2@2625,2817.96 ; C12.1@2646.53,2705 U6.33@2700.17,2704.37 ; C5.2@2651.53,2630 C6.2@2651.53,2590 2678.9,2562.64 U6.42@2700.17,2562.64 ; v1(2675,2505) 2675,2537.48 U6.42@2700.17,2562.64 ; U6.33@2700.17,2704.37 2725.63,2704.37 v1(2735,2695) ; C4.2@2750,2486.53 2748.39,2488.15 U6.44@2748.39,2530.16 U6.43@2732.64,2530.16 U6.42@2700.17,2562.64 ; C10.2@2800,2853.47 2827.13,2826.33 U6.22@2827.13,2799.84 2827.13,2757.87 v1(2830,2755) ; U6.48@2811.38,2530.16 U6.49@2827.13,2530.16 ; U6.49@2825,2528.03 U6.49@2827.13,2530.16 ; U6.10@2969.84,2704.37 2989.4,2704.4 3018.5,2733.5 C17.2@3018.47,2745 ; U6.1@2969.84,2562.64 2970.95,2561.53 C13.1@3025,2561.53 3048.47,2585 3110,2585 3135,2560 v1(3145,2560) ; v1(3015,2230) 3018.46,2226.54 C7.2@3070,2226.53 3031.02,2265.52 U2.8@3031.02,2295 3000,2295 2935,2360 2935,2415 2908.46,2441.54 C15.2@2900,2441.53 2900,2451.54 2876.54,2475 2850,2475 2827.13,2497.87 U6.49@2827.13,2530.16 ; C17.2@3018.47,2745 3018.46,2793.46 v1(3020,2795)
  Top Layer w23.62: v1(3725,2990) 3825,2990 H1.8@3840,3005
XIN: C14.2 U1.1 U6.20 | length 260.1
  Top Layer w8.07: U6.20@2858.62,2799.84 2858.62,2828.62 2870,2840 2955,2840 2984.61,2869.61 U1.1@2984.61,2873.5 2994.57,2883.46 C14.2@3065,2883.47
XOUT: R1.2 U6.21 | length 74.3
  Top Layer w8.07: U6.21@2842.88,2799.84 2842.88,2835.84 R1.2@2870,2862.96
pads on no net: U9.

## Polygon pours and split planes (outlines as drawn)
GND on Bottom Layer (solid): 1520,3895 4300,3895 4360,3835 4360,1775 4275,1690 1560,1690 1530,1660 1530,3840 1500,3870
GND on Top Layer (solid): 1640,3760 4175,3760 4195,3780 4195,1545 4170,1520 1650,1520 1630,1500 1630,3735 1610,3755 1605,3755 1565,3795
VCC on Internal Plane 2 (split plane): 96 vertices, not listed, extent 3826.72,1881.71 3863.29,1918.29
VCC on Internal Plane 2 (split plane): 96 vertices, not listed, extent 3766.72,1896.71 3803.29,1933.29
VCC on Internal Plane 2 (split plane): 96 vertices, not listed, extent 3696.72,1896.71 3733.29,1933.29
VCC on Internal Plane 2 (split plane): 96 vertices, not listed, extent 3621.72,1896.71 3658.29,1933.29
VCC on Internal Plane 2 (split plane): 96 vertices, not listed, extent 3556.72,1896.71 3593.29,1933.29
VCC on Internal Plane 2 (split plane): 96 vertices, not listed, extent 3486.72,1896.71 3523.29,1933.29
VCC on Internal Plane 2 (split plane): 96 vertices, not listed, extent 3416.72,1896.71 3453.29,1933.29
VCC on Internal Plane 2 (split plane): 96 vertices, not listed, extent 3356.72,1896.71 3393.29,1933.29
VCC on Internal Plane 2 (split plane): 96 vertices, not listed, extent 3286.72,1896.71 3323.29,1933.29
VCC on Internal Plane 2 (split plane): 96 vertices, not listed, extent 3226.72,1896.71 3263.29,1933.29
VCC on Internal Plane 2 (split plane): 96 vertices, not listed, extent 3171.72,1896.71 3208.29,1933.29
VCC on Internal Plane 2 (split plane): 96 vertices, not listed, extent 3106.72,1896.71 3143.29,1933.29
VCC on Internal Plane 2 (split plane): 96 vertices, not listed, extent 3051.72,1896.71 3088.29,1933.29
VCC on Internal Plane 2 (split plane): 96 vertices, not listed, extent 2966.72,1896.71 3003.29,1933.29
VCC on Internal Plane 2 (split plane): 96 vertices, not listed, extent 2896.72,1896.71 2933.29,1933.29
VCC on Internal Plane 2 (split plane): 96 vertices, not listed, extent 2826.72,1896.71 2863.29,1933.29
VCC on Internal Plane 2 (split plane): 96 vertices, not listed, extent 2756.72,1896.71 2793.29,1933.29
VCC on Internal Plane 2 (split plane): 96 vertices, not listed, extent 2691.72,1896.71 2728.29,1933.29
VCC on Internal Plane 2 (split plane): 96 vertices, not listed, extent 2631.72,1896.71 2668.29,1933.29
VCC on Internal Plane 2 (split plane): 96 vertices, not listed, extent 2561.72,1896.71 2598.29,1933.29
VCC on Internal Plane 2 (split plane): 96 vertices, not listed, extent 2496.72,1896.71 2533.29,1933.29
VCC on Internal Plane 2 (split plane): 96 vertices, not listed, extent 2436.72,1896.71 2473.29,1933.29
VCC on Internal Plane 2 (split plane): 96 vertices, not listed, extent 2371.72,1896.71 2408.29,1933.29
VCC on Internal Plane 2 (split plane): 96 vertices, not listed, extent 2286.72,1896.71 2323.29,1933.29
VCC on Internal Plane 2 (split plane): 96 vertices, not listed, extent 2221.72,1896.71 2258.29,1933.29
VCC on Internal Plane 2 (split plane): 96 vertices, not listed, extent 2156.72,1896.71 2193.29,1933.29
VCC on Internal Plane 2 (split plane): 96 vertices, not listed, extent 2096.72,1896.71 2133.29,1933.29
VCC on Internal Plane 2 (split plane): 96 vertices, not listed, extent 2036.72,1896.71 2073.29,1933.29
VCC on Internal Plane 2 (split plane): 96 vertices, not listed, extent 1961.72,1896.71 1998.29,1933.29
VCC on Internal Plane 2 (split plane): 96 vertices, not listed, extent 3011.72,1921.71 3048.29,1958.29
VCC on Internal Plane 2 (split plane): 96 vertices, not listed, extent 3826.72,1926.71 3863.29,1963.29
VCC on Internal Plane 2 (split plane): 96 vertices, not listed, extent 2341.72,1926.71 2378.29,1963.29
VCC on Internal Plane 2 (split plane): 96 vertices, not listed, extent 2646.72,1931.71 2683.29,1968.29
VCC on Internal Plane 2 (split plane): 96 vertices, not listed, extent 3141.72,1936.71 3178.29,1973.29
VCC on Internal Plane 2 (split plane): 257 vertices, not listed, extent 2536.18,1940.06 2603.26,2034.68
VCC on Internal Plane 2 (split plane): 257 vertices, not listed, extent 2876.74,1940.06 2943.82,2034.68
VCC on Internal Plane 2 (split plane): 96 vertices, not listed, extent 2821.72,1941.71 2858.29,1978.29
VCC on Internal Plane 2 (split plane): 96 vertices, not listed, extent 3231.72,1941.71 3268.29,1978.29
VCC on Internal Plane 2 (split plane): 96 vertices, not listed, extent 3321.72,1941.71 3358.29,1978.29
VCC on Internal Plane 2 (split plane): 96 vertices, not listed, extent 3436.72,1941.71 3473.29,1978.29
VCC on Internal Plane 2 (split plane): 96 vertices, not listed, extent 1961.72,1951.71 1998.29,1988.29
VCC on Internal Plane 2 (split plane): 96 vertices, not listed, extent 2426.72,1951.71 2463.29,1988.29
VCC on Internal Plane 2 (split plane): 96 vertices, not listed, extent 3686.72,1951.71 3723.29,1988.29
VCC on Internal Plane 2 (split plane): 96 vertices, not listed, extent 3531.72,1951.71 3568.29,1988.29
VCC on Internal Plane 2 (split plane): 96 vertices, not listed, extent 2241.72,1966.71 2278.29,2003.29
VCC on Internal Plane 2 (split plane): 96 vertices, not listed, extent 3081.72,1966.71 3118.29,2003.29
VCC on Internal Plane 2 (split plane): 96 vertices, not listed, extent 2101.72,1981.71 2138.29,2018.29
VCC on Internal Plane 2 (split plane): 96 vertices, not listed, extent 3826.72,1986.71 3863.29,2023.29
VCC on Internal Plane 2 (split plane): 96 vertices, not listed, extent 2476.72,1991.71 2513.29,2028.29
VCC on Internal Plane 2 (split plane): 96 vertices, not listed, extent 1961.72,2001.71 1998.29,2038.29
VCC on Internal Plane 2 (split plane): 96 vertices, not listed, extent 2341.72,2001.71 2378.29,2038.29
VCC on Internal Plane 2 (split plane): 96 vertices, not listed, extent 3631.72,2001.71 3668.29,2038.29
VCC on Internal Plane 2 (split plane): 96 vertices, not listed, extent 3386.72,2001.71 3423.29,2038.29
VCC on Internal Plane 2 (split plane): 96 vertices, not listed, extent 2651.72,2006.71 2688.29,2043.29
VCC on Internal Plane 2 (split plane): 96 vertices, not listed, extent 2811.72,2011.71 2848.29,2048.29
VCC on Internal Plane 2 (split plane): 96 vertices, not listed, extent 2051.72,2026.71 2088.29,2063.29
VCC on Internal Plane 2 (split plane): 96 vertices, not listed, extent 2236.72,2026.71 2273.29,2063.29
VCC on Internal Plane 2 (split plane): 96 vertices, not listed, extent 3476.72,2026.71 3513.29,2063.29
VCC on Internal Plane 2 (split plane): 96 vertices, not listed, extent 3701.72,2026.71 3738.29,2063.29
VCC on Internal Plane 2 (split plane): 96 vertices, not listed, extent 3561.72,2031.71 3598.29,2068.29
VCC on Internal Plane 2 (split plane): 96 vertices, not listed, extent 2316.72,2036.71 2353.29,2073.29
VCC on Internal Plane 2 (split plane): 96 vertices, not listed, extent 2616.72,2041.71 2653.29,2078.29
VCC on Internal Plane 2 (split plane): 96 vertices, not listed, extent 2441.72,2041.71 2478.29,2078.29
VCC on Internal Plane 2 (split plane): 96 vertices, not listed, extent 1961.72,2046.71 1998.29,2083.29
VCC on Internal Plane 2 (split plane): 96 vertices, not listed, extent 3826.72,2046.71 3863.29,2083.29
VCC on Internal Plane 2 (split plane): 169 vertices, not listed, extent 2721.72,2061.71 2773.29,2128.29
VCC on Internal Plane 2 (split plane): 96 vertices, not listed, extent 2111.72,2076.71 2148.29,2113.29
VCC on Internal Plane 2 (split plane): 96 vertices, not listed, extent 3171.72,2076.71 3208.29,2113.29
VCC on Internal Plane 2 (split plane): 96 vertices, not listed, extent 2406.72,2076.71 2443.29,2113.29
VCC on Internal Plane 2 (split plane): 96 vertices, not listed, extent 2286.72,2081.71 2323.29,2118.29
VCC on Internal Plane 2 (split plane): 96 vertices, not listed, extent 2171.72,2081.71 2208.29,2118.29
VCC on Internal Plane 2 (split plane): 96 vertices, not listed, extent 3366.72,2081.71 3403.29,2118.29
VCC on Internal Plane 2 (split plane): 96 vertices, not listed, extent 2241.72,2086.71 2278.29,2123.29
VCC on Internal Plane 2 (split plane): 96 vertices, not listed, extent 2351.72,2091.71 2388.29,2128.29
VCC on Internal Plane 2 (split plane): 96 vertices, not listed, extent 1961.72,2091.71 1998.29,2128.29
VCC on Internal Plane 2 (split plane): 96 vertices, not listed, extent 3826.72,2091.71 3863.29,2128.29
VCC on Internal Plane 2 (split plane): 96 vertices, not listed, extent 2471.72,2096.71 2508.29,2133.29
VCC on Internal Plane 2 (split plane): 257 vertices, not listed, extent 2539.13,2098.73 2600.31,2205.17
VCC on Internal Plane 2 (split plane): 257 vertices, not listed, extent 2879.69,2098.73 2940.87,2205.17
VCC on Internal Plane 2 (split plane): 96 vertices, not listed, extent 3466.72,2101.71 3503.29,2138.29
VCC on Internal Plane 2 (split plane): 96 vertices, not listed, extent 2671.72,2101.71 2708.29,2138.29
VCC on Internal Plane 2 (split plane): 96 vertices, not listed, extent 2781.72,2106.71 2818.29,2143.29
VCC on Internal Plane 2 (split plane): 97 vertices, not listed, extent 2607.34,2113.39 2645.1,2151.15
VCC on Internal Plane 2 (split plane): 97 vertices, not listed, extent 2834.9,2113.39 2872.66,2151.15
VCC on Internal Plane 2 (split plane): 96 vertices, not listed, extent 3611.72,2116.71 3648.29,2153.29
VCC on Internal Plane 2 (split plane): 96 vertices, not listed, extent 2036.72,2121.71 2073.29,2158.29
VCC on Internal Plane 2 (split plane): 96 vertices, not listed, extent 2081.72,2121.71 2118.29,2158.29
VCC on Internal Plane 2 (split plane): 96 vertices, not listed, extent 3826.72,2136.71 3863.29,2173.29
VCC on Internal Plane 2 (split plane): 96 vertices, not listed, extent 2426.72,2136.71 2463.29,2173.29
VCC on Internal Plane 2 (split plane): 96 vertices, not listed, extent 2271.72,2136.71 2308.29,2173.29
VCC on Internal Plane 2 (split plane): 96 vertices, not listed, extent 2191.72,2146.71 2228.29,2183.29
VCC on Internal Plane 2 (split plane): 96 vertices, not listed, extent 1961.72,2146.71 1998.29,2183.29
VCC on Internal Plane 2 (split plane): 229 vertices, not listed, extent 2476.72,2151.71 2548.29,2233.29
VCC on Internal Plane 2 (split plane): 96 vertices, not listed, extent 3706.72,2156.71 3743.29,2193.29
VCC on Internal Plane 2 (split plane): 96 vertices, not listed, extent 2361.72,2166.71 2398.29,2203.29
VCC on Internal Plane 2 (split plane): 96 vertices, not listed, extent 2011.72,2176.71 2048.29,2213.29
VCC on Internal Plane 2 (split plane): 96 vertices, not listed, extent 2976.72,2176.71 3013.29,2213.29
VCC on Internal Plane 2 (split plane): 96 vertices, not listed, extent 2121.72,2181.71 2158.29,2218.29
VCC on Internal Plane 2 (split plane): 96 vertices, not listed, extent 3116.72,2181.71 3153.29,2218.29
VCC on Internal Plane 2 (split plane): 96 vertices, not listed, extent 2271.72,2186.71 2308.29,2223.29
VCC on Internal Plane 2 (split plane): 96 vertices, not listed, extent 3576.72,2186.71 3613.29,2223.29
VCC on Internal Plane 2 (split plane): 96 vertices, not listed, extent 3411.72,2186.71 3448.29,2223.29
VCC on Internal Plane 2 (split plane): 96 vertices, not listed, extent 2401.72,2191.71 2438.29,2228.29
VCC on Internal Plane 2 (split plane): 96 vertices, not listed, extent 2316.72,2191.71 2353.29,2228.29
VCC on Internal Plane 2 (split plane): 96 vertices, not listed, extent 3826.72,2191.71 3863.29,2228.29
VCC on Internal Plane 2 (split plane): 96 vertices, not listed, extent 1961.72,2196.71 1998.29,2233.29
VCC on Internal Plane 2 (split plane): 96 vertices, not listed, extent 2206.72,2196.71 2243.29,2233.29
VCC on Internal Plane 2 (split plane): 96 vertices, not listed, extent 2816.72,2196.71 2853.29,2233.29
VCC on Internal Plane 2 (split plane): 96 vertices, not listed, extent 2061.72,2201.71 2098.29,2238.29
VCC on Internal Plane 2 (split plane): 96 vertices, not listed, extent 2706.72,2201.71 2743.29,2238.29
VCC on Internal Plane 2 (split plane): 96 vertices, not listed, extent 3171.72,2216.71 3208.29,2253.29
VCC on Internal Plane 2 (split plane): 96 vertices, not listed, extent 3511.72,2216.71 3548.29,2253.29
VCC on Internal Plane 2 (split plane): 96 vertices, not listed, extent 2461.72,2236.71 2498.29,2273.29
VCC on Internal Plane 2 (split plane): 96 vertices, not listed, extent 2391.72,2236.71 2428.29,2273.29
VCC on Internal Plane 2 (split plane): 96 vertices, not listed, extent 2336.72,2241.71 2373.29,2278.29
VCC on Internal Plane 2 (split plane): 96 vertices, not listed, extent 2161.72,2241.71 2198.29,2278.29
VCC on Internal Plane 2 (split plane): 96 vertices, not listed, extent 2216.72,2241.71 2253.29,2278.29
VCC on Internal Plane 2 (split plane): 96 vertices, not listed, extent 2896.72,2241.71 2933.29,2278.29
VCC on Internal Plane 2 (split plane): 96 vertices, not listed, extent 2271.72,2246.71 2308.29,2283.29
VCC on Internal Plane 2 (split plane): 96 vertices, not listed, extent 2091.72,2251.71 2128.29,2288.29
VCC on Internal Plane 2 (split plane): 96 vertices, not listed, extent 1961.72,2251.71 1998.29,2288.29
VCC on Internal Plane 2 (split plane): 96 vertices, not listed, extent 2041.72,2256.71 2078.29,2293.29
VCC on Internal Plane 2 (split plane): 121 vertices, not listed, extent 3804.49,2269.49 3875.51,2340.51
VCC on Internal Plane 2 (split plane): 96 vertices, not listed, extent 3121.72,2271.71 3158.29,2308.29
VCC on Internal Plane 2 (split plane): 96 vertices, not listed, extent 3686.72,2271.71 3723.29,2308.29
VCC on Internal Plane 2 (split plane): 96 vertices, not listed, extent 3596.72,2276.71 3633.29,2313.29
VCC on Internal Plane 2 (split plane): 96 vertices, not listed, extent 3416.72,2276.71 3453.29,2313.29
VCC on Internal Plane 2 (split plane): 96 vertices, not listed, extent 3181.72,2276.71 3218.29,2313.29
VCC on Internal Plane 2 (split plane): 96 vertices, not listed, extent 2871.72,2276.71 2908.29,2313.29
VCC on Internal Plane 2 (split plane): 320 vertices, not listed, extent 2401.72,2286.71 2483.29,2373.29
VCC on Internal Plane 2 (split plane): 502 vertices, not listed, extent 2296.72,2291.71 2413.29,2388.29
VCC on Internal Plane 2 (split plane): 162 vertices, not listed, extent 3081.72,2296.71 3138.29,2358.29
VCC on Internal Plane 2 (split plane): 96 vertices, not listed, extent 1961.72,2306.71 1998.29,2343.29
VCC on Internal Plane 2 (split plane): 96 vertices, not listed, extent 2716.72,2306.71 2753.29,2343.29
VCC on Internal Plane 2 (split plane): 96 vertices, not listed, extent 2136.72,2316.71 2173.29,2353.29
VCC on Internal Plane 2 (split plane): 96 vertices, not listed, extent 2031.72,2321.71 2068.29,2358.29
VCC on Internal Plane 2 (split plane): 96 vertices, not listed, extent 2176.72,2326.71 2213.29,2363.29
VCC on Internal Plane 2 (split plane): 96 vertices, not listed, extent 2276.72,2336.71 2313.29,2373.29
VCC on Internal Plane 2 (split plane): 96 vertices, not listed, extent 2096.72,2341.71 2133.29,2378.29
VCC on Internal Plane 2 (split plane): 96 vertices, not listed, extent 2881.72,2351.71 2918.29,2388.29
VCC on Internal Plane 2 (split plane): 96 vertices, not listed, extent 3181.72,2356.71 3218.29,2393.29
VCC on Internal Plane 2 (split plane): 96 vertices, not listed, extent 2431.72,2361.71 2468.29,2398.29
VCC on Internal Plane 2 (split plane): 96 vertices, not listed, extent 1961.72,2361.71 1998.29,2398.29
VCC on Internal Plane 2 (split plane): 133 vertices, not listed, extent 3804.39,2369.39 3875.61,2440.61
VCC on Internal Plane 2 (split plane): 96 vertices, not listed, extent 2061.72,2371.71 2098.29,2408.29
VCC on Internal Plane 2 (split plane): 177 vertices, not listed, extent 2371.72,2376.71 2433.29,2438.29
VCC on Internal Plane 2 (split plane): 264 vertices, not listed, extent 2211.72,2376.71 2283.29,2448.29
VCC on Internal Plane 2 (split plane): 96 vertices, not listed, extent 3361.72,2376.71 3398.29,2413.29
VCC on Internal Plane 2 (split plane): 96 vertices, not listed, extent 2951.72,2376.71 2988.29,2413.29
VCC on Internal Plane 2 (split plane): 96 vertices, not listed, extent 3136.72,2381.71 3173.29,2418.29
VCC on Internal Plane 2 (split plane): 96 vertices, not listed, extent 2701.72,2381.71 2738.29,2418.29
VCC on Internal Plane 2 (split plane): 96 vertices, not listed, extent 2121.72,2386.71 2158.29,2423.29
VCC on Internal Plane 2 (split plane): 154 vertices, not listed, extent 2156.72,2386.71 2208.29,2448.29
VCC on Internal Plane 2 (split plane): 96 vertices, not listed, extent 2426.72,2401.71 2463.29,2438.29
VCC on Internal Plane 2 (split plane): 96 vertices, not listed, extent 3526.72,2421.71 3563.29,2458.29
VCC on Internal Plane 2 (split plane): 96 vertices, not listed, extent 1961.72,2421.71 1998.29,2458.29
VCC on Internal Plane 2 (split plane): 96 vertices, not listed, extent 2106.72,2421.71 2143.29,2458.29
VCC on Internal Plane 2 (split plane): 96 vertices, not listed, extent 2031.72,2426.71 2068.29,2463.29
VCC on Internal Plane 2 (split plane): 96 vertices, not listed, extent 3611.72,2426.71 3648.29,2463.29
VCC on Internal Plane 2 (split plane): 96 vertices, not listed, extent 3131.72,2426.71 3168.29,2463.29
VCC on Internal Plane 2 (split plane): 96 vertices, not listed, extent 2191.72,2431.71 2228.29,2468.29
VCC on Internal Plane 2 (split plane): 183 vertices, not listed, extent 2446.72,2436.71 2503.29,2503.29
VCC on Internal Plane 2 (split plane): 96 vertices, not listed, extent 3676.72,2451.71 3713.29,2488.29
VCC on Internal Plane 2 (split plane): 96 vertices, not listed, extent 3476.72,2456.71 3513.29,2493.29
VCC on Internal Plane 2 (split plane): 96 vertices, not listed, extent 2221.72,2456.71 2258.29,2493.29
VCC on Internal Plane 2 (split plane): 96 vertices, not listed, extent 3586.72,2461.71 3623.29,2498.29
VCC on Internal Plane 2 (split plane): 96 vertices, not listed, extent 2926.72,2461.71 2963.29,2498.29
VCC on Internal Plane 2 (split plane): 96 vertices, not listed, extent 2081.72,2466.71 2118.29,2503.29
VCC on Internal Plane 2 (split plane): 133 vertices, not listed, extent 3804.39,2469.39 3875.61,2540.61
VCC on Internal Plane 2 (split plane): 163 vertices, not listed, extent 2141.72,2471.71 2203.29,2528.29
VCC on Internal Plane 2 (split plane): 96 vertices, not listed, extent 1961.72,2481.71 1998.29,2518.29
VCC on Internal Plane 2 (split plane): 96 vertices, not listed, extent 2381.72,2486.71 2418.29,2523.29
VCC on Internal Plane 2 (split plane): 96 vertices, not listed, extent 2426.72,2486.71 2463.29,2523.29
VCC on Internal Plane 2 (split plane): 96 vertices, not listed, extent 2056.72,2496.71 2093.29,2533.29
VCC on Internal Plane 2 (split plane): 96 vertices, not listed, extent 2686.72,2501.71 2723.29,2538.29
VCC on Internal Plane 2 (split plane): 96 vertices, not listed, extent 2466.72,2506.71 2503.29,2543.29
VCC on Internal Plane 2 (split plane): 96 vertices, not listed, extent 2546.72,2506.71 2583.29,2543.29
VCC on Internal Plane 2 (split plane): 96 vertices, not listed, extent 2941.72,2511.71 2978.29,2548.29
VCC on Internal Plane 2 (split plane): 96 vertices, not listed, extent 3631.72,2521.71 3668.29,2558.29
VCC on Internal Plane 2 (split plane): 96 vertices, not listed, extent 3691.72,2531.71 3728.29,2568.29
VCC on Internal Plane 2 (split plane): 96 vertices, not listed, extent 3061.72,2531.71 3098.29,2568.29
VCC on Internal Plane 2 (split plane): 96 vertices, not listed, extent 2516.72,2531.71 2553.29,2568.29
VCC on Internal Plane 2 (split plane): 96 vertices, not listed, extent 1961.72,2536.71 1998.29,2573.29
VCC on Internal Plane 2 (split plane): 96 vertices, not listed, extent 2051.72,2541.71 2088.29,2578.29
VCC on Internal Plane 2 (split plane): 96 vertices, not listed, extent 2566.72,2541.71 2603.29,2578.29
VCC on Internal Plane 2 (split plane): 96 vertices, not listed, extent 3581.72,2546.71 3618.29,2583.29
VCC on Internal Plane 2 (split plane): 96 vertices, not listed, extent 2906.72,2556.71 2943.29,2593.29
VCC on Internal Plane 2 (split plane): 177 vertices, not listed, extent 2731.72,2556.71 2773.29,2628.29
VCC on Internal Plane 2 (split plane): 96 vertices, not listed, extent 2866.72,2561.71 2903.29,2598.29
VCC on Internal Plane 2 (split plane): 96 vertices, not listed, extent 2821.72,2566.71 2858.29,2603.29
VCC on Internal Plane 2 (split plane): 96 vertices, not listed, extent 3441.72,2566.71 3478.29,2603.29
VCC on Internal Plane 2 (split plane): 133 vertices, not listed, extent 3804.39,2569.39 3875.61,2640.61
VCC on Internal Plane 2 (split plane): 96 vertices, not listed, extent 2066.72,2581.71 2103.29,2618.29
VCC on Internal Plane 2 (split plane): 96 vertices, not listed, extent 2026.72,2586.71 2063.29,2623.29
VCC on Internal Plane 2 (split plane): 96 vertices, not listed, extent 1961.72,2591.71 1998.29,2628.29
VCC on Internal Plane 2 (split plane): 96 vertices, not listed, extent 2471.72,2601.71 2508.29,2638.29
VCC on Internal Plane 2 (split plane): 96 vertices, not listed, extent 2896.72,2611.71 2933.29,2648.29
VCC on Internal Plane 2 (split plane): 96 vertices, not listed, extent 3646.72,2616.71 3683.29,2653.29
VCC on Internal Plane 2 (split plane): 96 vertices, not listed, extent 2041.72,2621.71 2078.29,2658.29
VCC on Internal Plane 2 (split plane): 96 vertices, not listed, extent 2091.72,2641.71 2128.29,2678.29
VCC on Internal Plane 2 (split plane): 96 vertices, not listed, extent 2511.72,2646.71 2548.29,2683.29
VCC on Internal Plane 2 (split plane): 96 vertices, not listed, extent 2611.72,2646.71 2648.29,2683.29
VCC on Internal Plane 2 (split plane): 96 vertices, not listed, extent 1961.72,2651.71 1998.29,2688.29
VCC on Internal Plane 2 (split plane): 188 vertices, not listed, extent 2121.72,2666.71 2168.29,2738.29
VCC on Internal Plane 2 (split plane): 133 vertices, not listed, extent 3804.39,2669.39 3875.61,2740.61
VCC on Internal Plane 2 (split plane): 96 vertices, not listed, extent 3426.72,2686.71 3463.29,2723.29
VCC on Internal Plane 2 (split plane): 96 vertices, not listed, extent 3256.72,2686.71 3293.29,2723.29
VCC on Internal Plane 2 (split plane): 96 vertices, not listed, extent 3141.72,2686.71 3178.29,2723.29
VCC on Internal Plane 2 (split plane): 96 vertices, not listed, extent 3661.72,2691.71 3698.29,2728.29
VCC on Internal Plane 2 (split plane): 96 vertices, not listed, extent 2416.72,2691.71 2453.29,2728.29
VCC on Internal Plane 2 (split plane): 96 vertices, not listed, extent 2076.72,2701.71 2113.29,2738.29
VCC on Internal Plane 2 (split plane): 96 vertices, not listed, extent 1961.72,2706.71 1998.29,2743.29
VCC on Internal Plane 2 (split plane): 177 vertices, not listed, extent 2731.72,2731.71 2803.29,2773.29
VCC on Internal Plane 2 (split plane): 96 vertices, not listed, extent 2851.72,2731.71 2888.29,2768.29
VCC on Internal Plane 2 (split plane): 96 vertices, not listed, extent 2076.72,2741.71 2113.29,2778.29
VCC on Internal Plane 2 (split plane): 96 vertices, not listed, extent 3201.72,2746.71 3238.29,2783.29
VCC on Internal Plane 2 (split plane): 96 vertices, not listed, extent 2356.72,2746.71 2393.29,2783.29
VCC on Internal Plane 2 (split plane): 96 vertices, not listed, extent 2006.72,2751.71 2043.29,2788.29
VCC on Internal Plane 2 (split plane): 96 vertices, not listed, extent 3656.72,2756.71 3693.29,2793.29
VCC on Internal Plane 2 (split plane): 96 vertices, not listed, extent 3071.72,2761.71 3108.29,2798.29
VCC on Internal Plane 2 (split plane): 96 vertices, not listed, extent 1961.72,2766.71 1998.29,2803.29
VCC on Internal Plane 2 (split plane): 133 vertices, not listed, extent 3804.39,2769.39 3875.61,2840.61
VCC on Internal Plane 2 (split plane): 96 vertices, not listed, extent 2411.72,2776.71 2448.29,2813.29
VCC on Internal Plane 2 (split plane): 96 vertices, not listed, extent 2076.72,2781.71 2113.29,2818.29
VCC on Internal Plane 2 (split plane): 175 vertices, not listed, extent 2461.72,2786.71 2498.29,2858.29